# Altium PCB RT_SUPER_C1.PCBdoc (part 3 of 3)
Units mil, origin at the board's own origin, x right, y up, seen from the top; angles counter-clockwise.
Board outline 1450 x 1450 mil, 6 copper layers (Top Layer, GND2, PWR3, PWR4, GND5, Bottom Layer), stack 39.512 mil thick; 158 components, 116 nets, 476 pads, 207 vias.
Unrouted connection lines stored in the file: 5.
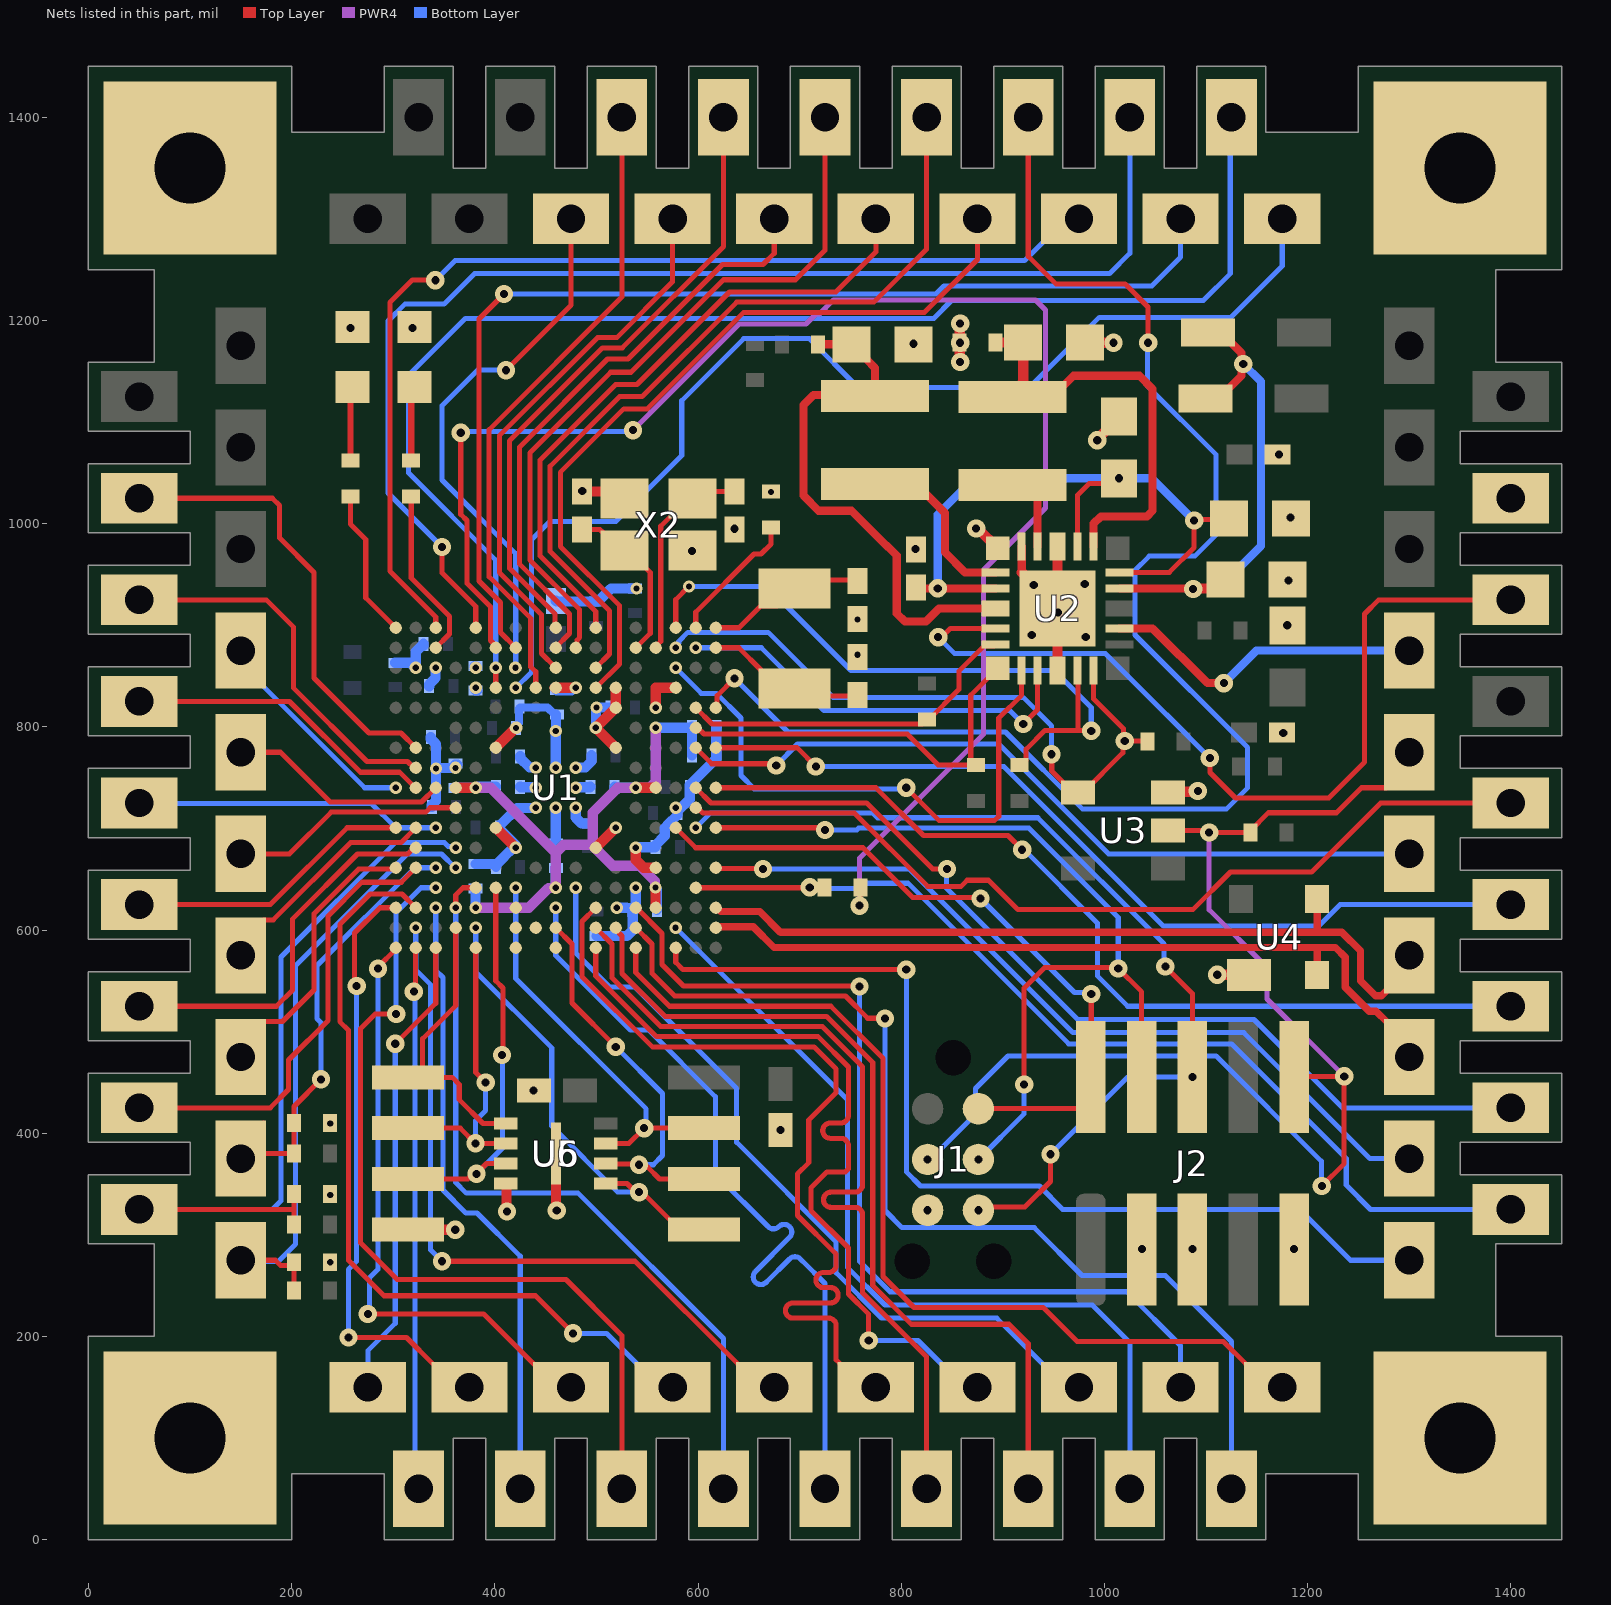
[diagram p6: the nets of this part, all layers, seen from the top]

## Via types
v1: diameter 18, hole 8, Top Layer to Bottom Layer, tented both sides, 116 vias
v2: diameter 12, hole 6, Top Layer to Bottom Layer, tented both sides, 91 vias

## Nets (pads, with @x,y where several pads share a name; then routed paths per layer and width w, separated by ;. In a path a pad name is that pad's centre, name@x,y a point inside that pad or via, vN(x,y) a via of type N, cw(c..) or ccw(c..) an arc to the next point about the centre after c; other vN are vias at no path point) (continued)
FC0-SSEL0: T6.1 U1.H2 | length 375.8
  Top Layer w5: T6.1@50,925 175,925 202,898 202,838 274.13,765.87 314.13,765.87 320.31,759.68 U1.H2@322.2,759.68
FC0-SSEL1: T7.1 U1.J1 | length 216.1
  Bottom Layer w5: T7.1@150,875 172.5,852.5 172.5,839.5 272,740 v2(302.52,740)
FC0-TXD: T4.1 U1.G2 | length 453.5
  Top Layer w5: T4.1@50,1025 181,1025 188,1018 188,986 222,952 222,848.14 276.14,794 307.57,794 U1.G2@322.2,779.37
FC1-CLK: T8.1 U1.J2 | length 307.4
  Top Layer w5: T8.1@50,825 198,825 267.73,755.27 306.34,755.27 321.61,740 U1.J2@322.2,740
FC1-RXD: T10.1 U1.L3 | length 302
  Bottom Layer w5: T10.1@50,725 50.48,724.52 278.48,724.52 302.37,700.63 v2(341.89,700.63)
FC1-SSEL0: T9.1 U1.J3 | length 218
  Top Layer w5: T9.1@150,775 189,775 238,726 327.89,726 U1.J3@341.89,740
FC1-SSEL1: T12.1 U1.L1 | length 283.8
  Top Layer w5: T12.1@50,625 179,625 254.63,700.63 U1.L1@302.52,700.63
FC1-TXD: T11.1 U1.K4 | length 230.3
  Top Layer w5: T11.1@150,675 198,675 239,716 332.03,716 336.35,720.31 U1.K4@361.57,720.31
FC2-CLK: T62.1 U1.A3 | length 1051.7
  Top Layer w5: v1(341.51,1239.48) 341.07,1239.92 318.92,1239.92 296.63,1217.63 296.63,953.37 341.89,908.11 U1.A3@341.89,897.48
  Bottom Layer w5: v1(341.51,1239.48) 361.03,1259 921.5,1259 962.5,1300 T62.1@975,1300
FC2-SDA: T59.1 U1.D6 | length 1347.9
  Top Layer w5: U1.D6@400.94,838.43 v2(400.94,858.11)
  Bottom Layer w5: v2(400.94,858.11) 400.94,964.06 315,1050 315,1146 371,1202 832,1202 849.5,1219.5 1097.36,1219.5 1123.84,1245.98 1123.84,1398.84 T59.1@1125,1400
FC2-SSEL0: T58.1 U1.D7 | length 1120.5
  Bottom Layer w5: v2(420.63,838.43) 436,853.8 436,984 454,1002 519,1002 584,1067 584,1121 645,1182 709.5,1182 757.5,1134 926,1134 995,1203 1124.53,1203 1175,1253.47 T58.1@1175,1300
FC2-SSEL1: T60.1 U1.B7 | length 1092.1
  Top Layer w5: v1(409,1226) 384.47,1201.47 384.47,943.52 405.7,922.29 405.7,892.73 U1.B7@420.63,877.8
  Bottom Layer w5: v1(409,1226) 834,1226 842,1234 1046.72,1234 1075,1262.28 T60.1@1075,1300
FC2-WS: T61.1 U1.A5 | length 1229.5
  Top Layer w5: v1(348,977) 348.2,976.8 348.2,951.5 381.26,918.44 U1.A5@381.26,897.48
  Bottom Layer w5: v1(348,977) 294.87,1030.13 294.87,1199.48 311.4,1216 350,1216 380,1246 1005,1246 1025,1266 T61.1@1025,1400
FC3-CLK: T72.1 U1.C7 | length 552.4
  Top Layer w5: v1(411,1151) 475,1215 T72.1@475,1300
  Bottom Layer w5: v1(411,1151) 383,1151 348,1116 348,1043 420.63,970.37 420.63,858.58 v2(420.16,858.11) ; T72.1@467.05,1292.05 T72.1@475,1300
FC3-SDA: T70.1 U1.C9 | length 546.7
  Top Layer w5: U1.C9@460,858.11 446,872.11 446,910.27 404.47,951.8 404.47,1086.47 501,1183 520,1183 575,1238 T70.1@575,1300
FC3-SSEL0: T68.1 U1.B9 | length 630.9
  Top Layer w5: U1.B9@460,877.8 460,878.39 473.5,891.89 473.5,911.06 424.47,960.09 424.47,1075.47 511,1162 531,1162 624,1255 664,1255 675,1266 T68.1@675,1300 662.95,1300 T68.1@640.45,1277.5
FC3-SSEL1: T69.1 U1.A9 | length 619.9
  Top Layer w5: U1.A9@460,897.48 459.43,898.05 459.43,910.98 414.47,955.95 414.47,1081.47 506,1173 525.4,1173 625,1272.6 T69.1@625,1400
FC3-WS: T71.1 U1.D8 | length 634.6
  Top Layer w5: U1.D8@440.32,838.43 440.32,854.22 435.39,859.14 435.39,906.74 394.47,947.66 394.47,1092.47 525,1223 T71.1@525,1400
FC4-CLK: T64.1 U1.D11 | length 785.7
  Top Layer w5: U1.D11@499.37,838.43 522.87,861.93 522.87,919.13 464.47,977.53 464.47,1050.47 527,1113 550,1113 645,1208 823.02,1208 875,1259.98 T64.1@875,1300
  PWR4 w5: T64.1@872.6,1300 T64.1@875,1300
FC4-SDA: T65.1 U1.C11 | length 817.1
  Top Layer w5: U1.C11@499.37,858.11 512.87,871.61 512.87,914.11 454.47,972.51 454.47,1056.47 523,1125 545,1125 638,1218 773.01,1218 825,1269.99 T65.1@825,1400
FC4-SSEL0: T66.1 U1.A11 | length 635.7
  Top Layer w5: U1.A11@499.37,897.48 499.37,913.47 444.47,968.37 444.47,1062.47 519,1137 540,1137 631,1228 735.56,1228 775,1267.44 T66.1@775,1300
FC4-SSEL1: T63.1 U1.E17 | length 1486.1
  Top Layer w5: U1.E17@617.48,818.74 618.82,820.08 618.82,830.61 v1(635.93,847.71) ; T63.1@925,1400 925,1263.19 952.19,1236 1020.18,1236 1043,1213.18 v1(1043,1178)
  Bottom Layer w5: v1(635.93,847.71) 688.64,795 902.62,795 978.7,718.92 1119.93,718.92 1141.01,740 1141.01,779.57 1030.17,890.41 1030.17,954.06 1044.1,968 1089,968 1110,989 1110,1067.81 1042.27,1135.54 1042.27,1177.27 v1(1043,1178)
FC4-WS: T67.1 U1.B10 | length 717.7
  Top Layer w5: U1.B10@479.69,877.8 481.02,879.13 481.02,885.27 483.5,887.75 483.5,915.2 434.47,964.23 434.47,1069.47 514,1149 534,1149 625,1240 696,1240 725,1269 T67.1@725,1400
FC5-RXD: T42.1 U1.J16 | length 944.3
  Top Layer w5: U1.J16@597.8,740 612.8,725 766,725 831,660 v1(845,660)
  Bottom Layer w5: v1(845,660) 844.67,659.67 844.67,641 973.67,512 1147.33,512 1234.33,425 T42.1@1400,425
FC5-SCK: T47.1 U1.G16 | length 762.8
  Top Layer w5: U1.G16@597.8,779.37 613.54,763.62 675.38,763.62 v1(677,762)
  Bottom Layer w5: v1(677,762) 698,783 896,783 1004,675 T47.1@1300,675
FC5-SSEL0: T44.1 U1.J17 | length 902
  Top Layer w5: U1.J17@617.48,740 775,740 822,693 905,693 v1(919,679)
  Bottom Layer w5: v1(919,679) 921,679 993,607 993,555 1023,525 T44.1@1400,525
FC5-TXD: T46.1 U1.G17 | length 863.9
  Top Layer w5: U1.G17@617.48,779.37 697.63,779.37 v1(716,761)
  Bottom Layer w5: v1(716,761) 901,761 1058,604 1211,604 1232,625 T46.1@1400,625
FLEXSPI0A-D0: U1.T5 U5.5 U6.5 | length 454.4
  Top Layer w5: U5.5@509.21,350.47 530.01,350.47 538.48,342 545.05,342 582.05,305 U6.5@605.67,305
  Bottom Layer w5: v2(381.26,602.2) 381.26,558.74 456,484 456,407 521,342 v1(542,342)
FLEXSPI0A-D1: U1.U5 U5.2 U6.2 | length 303.4
  Top Layer w5: U6.2@314.33,405 366,405 v1(381,390) 410.71,389.92 U5.2@410.79,389.84 ; U1.U5@381.26,582.52 381.26,459.74 v1(391,450)
  Bottom Layer w5: v1(381,390) 381,412.26 391,422.26 v1(391,450)
FLEXSPI0A-D2: U1.P6 U5.3 U6.3 | length 398.6
  Top Layer w5: U6.3@314.33,355 373.48,355 378.48,360 v1(382,360) 382,360.29 391.79,370.08 410.71,370.08 U5.3@410.79,370.16 ; U1.P6@400.94,641.57 400.94,550.06 408,543 408,478 v1(407,477)
  Bottom Layer w5: v1(382,360) 407.5,385.5 407.5,476.5 v1(407,477)
FLEXSPI0A-D3: U1.P7 U5.7 U6.7 | length 393.3
  Top Layer w5: U5.7@509.21,389.84 509.29,389.92 531.92,389.92 v1(547,405) U6.7@605.67,405
  Bottom Layer w5: v2(420.63,641.57) 420.63,552.37 549,424 549,407 v1(547,405)
FLEXSPI0A-D4: U1.T7
FLEXSPI0A-D5: U1.U7 | length 1.9
  Top Layer w5: U1.U7@419.29,581.18 U1.U7@420.63,582.52
FLEXSPI0A-D6: U1.R7
FLEXSPI0A-D7: U1.T8 | length 1.9
  Top Layer w5: U1.T8@440.32,600.31 U1.T8@440.32,602.2
FLEXSPI0A-DQS: U1.U9
FLEXSPI0A-SCK: U1.T9 U5.6 U6.6 | length 397.2
  Top Layer w5: U1.T9@460,602.2 475.87,586.33 475.87,528.13 v1(519,485) ; U5.6@509.21,370.16 509.79,369.58 541.42,369.58 544.49,366.51 550.49,366.51 562,355 U6.6@605.67,355
  Bottom Layer w5: v1(519,485) 565,439 565,378 556,369 v1(542,369)
FLEXSPI0A-SS0-N: U1.T4 U5.1 U6.1 | length 294
  Top Layer w5: U1.T4@361.57,602.2 361.57,525.57 329,493 329,464.31 U6.1@319.69,455 ; U5.1@410.79,409.53 388.47,409.53 365,433 365,448 358,455 340.33,455 U6.1@319.69,455 ; U6.1@319.69,455 U6.1@314.33,455 U6.1@319.69,455
FLEXSPI0B-CLK: T20.1 U1.U3 | length 466.7
  Top Layer w5: T20.1@275,150 T20.1@275,156.52 ; v1(302,488) 341.89,527.89 U1.U3@341.89,582.52
  Bottom Layer w5: T20.1@275,150 275,186 302,213 v1(302,488)
GND: C1.1 C2.2 C3.1 C4.1 C5.2 C6.1 C7.1 C8.2 C9.1 C10.1 C11.1 C12.1 C13.1 C14.1 C15.1 C16.1 C17.1 C18.1 C19.1 C20.1 C21.1 C22.1 C23.1 C24.1 C25.1 C26.1 C27.1 C28.1 C29.1 C30.1 C31.1 C32.1 C33.1 C34.1 C35.1 C36.1 C37.1 C38.1 C39.1 C40.1 C41.1 C42.2 C43.2 C44.2 C45.2 D3.C D4.C J1.5 J2.3 J2.5 J2.9 pad.2 R1.1 R15.1 R17.1 R18.1 T54.1 U1.C2 U1.C3 U1.D5 U1.D12 U1.D15 U1.E12 U1.E14 U1.F7 U1.F11 U1.G6 U1.G12 U1.H8 U1.H9 U1.H10 U1.J8 U1.J10 U1.K8 U1.K9 U1.K10 U1.L6 U1.L12 U1.M7 U1.M11 U1.M13 U1.N14 U1.P13 U2.9 U2.21 U2.23 U2.24 U2.25 U3.3 U4.1 U5.4 U5.9 U6.4 X2.2 X2.4 | length 1698
  Top Layer w8: U2.25@918.61,951.98 U2.23@918.61,977.57
  Top Layer w10: R18.1@237.72,273 v2(238,273) ; R17.1@237.72,340 238,339.72 v2(238,339) ; v1(258,1192.68) 258.67,1193.35 D3.C@259.93,1193.35 ; U6.4@314.33,305 v1(361,305) ; v1(318.95,1192.68) 319.62,1193.35 D4.C@320.87,1193.35 ; U1.G6@400.94,779.37 U1.F7@420.57,799 ; U1.L6@401.49,700.63 U1.L6@400.94,700.63 v2(420.63,680.94) ; U5.4@410.79,350.47 411.39,349.87 411.39,323.61 v1(412,323) ; U1.F7@420.63,799.06 420.94,799.06 v2(421,799) ; v1(438,442) C43.2@438.36,442 ; U5.9@460,380 U5.9@460,380 460.08,324.92 v1(461,324) ; C19.1@486,1031.7 v1(486,1032) 486.3,1031.7 520.43,1031.7 X2.2@527.54,1024.59 ; U1.M11@499.37,680.94 v2(519.06,700.63) ; U1.G12@519.06,779.37 v2(499.37,799.06) U1.E12@519.06,818.74 U1.E12@519.06,818.74 519,838.37 U1.D12@519.06,838.43 ; v2(538.74,680.94) 538.74,669.13 546.61,661.26 U1.N14@558.43,661.26 ; v2(558.43,818.74) 558.43,838.43 U1.D15@578.11,838.43 ; v1(594,973) X2.4@594.46,973.41 X2.4@594.46,973.41 ; C11.1@636,994.3 v1(636,995) ; v2(672,1031) R1.1@672,1031.72 ; v1(681,403) C42.2@681,403.36 ; C45.2@757,869.68 757.16,869.85 v2(757.16,870.93) ; C44.2@757,905.31 v2(757,905.77) ; v1(812,1177) v1(812,1177) C9.1@812.04,1176.53 ; v1(814,975) 814.23,975 C8.2@814.47,974.76 ; v1(873.74,995.26) 875.33,995.26 U2.24@894.92,975.67 ; U2.25@918.61,951.98 U2.25@953.98,916.61 ; U2.9@953.98,855.59 U2.25@953.98,913.06 ; U2.21@953.98,977.64 U2.25@953.98,916.61 ; v1(954.45,912.58) U2.25@953.98,913.06 ; C7.1@981.09,1178.11 981.2,1178 v1(1009,1178) ; v1(993,1082) 993,1083.16 1014.48,1104.64 C5.2@1014.48,1105.62 ; J2.3@1036.67,285.42 1036.67,285.67 v1(1037,286) ; U3.3@1062.72,735.42 1063.43,736.13 1091.26,736.13 v1(1091.96,736.83) ; J2.5@1086.67,285.42 v1(1086.67,286.09) ; v1(1111,556) U4.1@1140.74,556 ; C4.1@1170.18,1068.11 1171.89,1068.11 v1(1172,1068) ; C3.1@1174.93,794.35 1175.1,794.18 1175.82,794.18 v1(1176,794) ; C18.1@1180,899.51 v1(1180,900) ; C1.1@1179.99,945.11 1181,944.1 v1(1181,944) ; C18.1@1180.24,899.76 C18.1@1180.98,900.5 ; v1(1183,1006) 1183,1005.51 C2.2@1183.4,1005.11 ; J2.9@1186.67,285.42 v1(1186.67,286.09) ; U2.25@953.98,913.06 U2.25@953.98,916.61
  Bottom Layer w5: C38.1@329.89,879.76 C38.1@329.89,879.92
  Bottom Layer w8: v2(421,799) 421,800.97 423.69,803.66 423.69,818.2 424.61,819.12 451.91,819.12 459.03,812 C34.1@461,812
  Bottom Layer w10: C6.1@302,863 316.77,863 321.66,858.11 v2(322.2,858.11) 322.2,873.91 328.14,879.84 329.81,879.84 329.89,879.92 C38.1@329.89,881.73 ; C39.1@335.41,840 335.41,841.81 341.51,847.91 341.51,857.73 v2(341.89,858.11) ; C16.1@337,790 337,788.19 342,783.19 v2(342,759) ; C40.1@338,721.16 338,722.97 342,726.97 v2(342,759) ; C30.1@361.08,763 C30.1@363.05,763 ; v2(361.4,759.63) 361.15,759.38 342.38,759.38 v2(342,759) ; C33.1@380.99,835.71 C33.1@382.8,835.71 ; C32.1@382.81,665 C32.1@381,665 C32.1@381,665 399.89,664.92 C24.1@401,663.81 ; C24.1@401,662 C24.1@401,663.81 ; C29.1@425,741 425.5,740.5 439.82,740.5 v2(440.32,740) ; C21.1@425,771 425,769.19 434.12,760.07 439.93,760.07 v2(440.32,759.68) ; v2(440.32,720.31) 439.93,719.93 422.12,719.93 405,702.81 C20.1@405,701 405,699.19 420.25,683.94 420.25,681.33 v2(420.63,680.94) 420.25,680.56 417.61,680.56 408.87,671.82 408.87,671.68 C24.1@401,663.81 ; C27.1@460,685.26 v2(460,720.31) ; v2(460,759.68) v2(460,796) 460.38,796.38 C34.1@460.38,811.92 ; C10.1@460,924.06 460.87,923.18 C36.1@499.57,923.18 ; v2(479.69,720.31) 479.69,710.61 485.54,704.76 C15.1@492.48,704.76 ; v2(479.69,740) 480.19,740.5 493.5,740.5 C28.1@494,741 ; v2(479.69,759.68) 479.93,759.93 489.14,759.93 495,765.78 C22.1@495,772 ; v2@498.95,800.01 499.37,799.6 v2(499.37,799.06) 499.69,799.37 499.69,818.68 v2(500,819) C41.1@514,819 ; C12.1@500,594 529.93,594 535.79,599.86 535.79,617.92 535.6,618.11 C31.1@535.6,619.92 C31.1@535.6,621.73 ; C36.1@501.46,923.26 514.25,936.06 C37.1@538,936.06 ; v2(520.04,621.89) 529.74,621.89 529.82,621.81 535.52,621.81 C31.1@535.6,621.73 ; v2(538.74,641.57) 538.74,624.87 C31.1@535.6,621.73 ; v2(538.74,680.94) 539.23,681.44 557.74,681.44 C14.1@558.24,681.93 558.24,683.74 567.31,692.82 567.31,700.48 570.8,703.97 570.8,704.11 579.88,713.19 C23.1@579.88,715 C23.1@579.88,716.81 ; C37.1@538.94,936.06 539,936 v2(539.5,936) ; v2(578.11,720.31) 578.11,718.58 C23.1@579.88,716.81 ; C25.1@591.88,741 C25.1@591.8,740.16 ; C25.1@591.88,741 591.88,742.81 617.92,768.85 617.92,771.92 C35.1@618,772 C26.1@618,800 C26.1@618.39,800 ; C25.1@591.96,740 C25.1@591.8,740.16 ; C23.1@579.88,716.81 591.8,728.73 C25.1@591.8,740.16
  other v1: 826,324.15 981.66,888.5 928.51,890.31 930.48,939.52 980.68,940.51
  other v2: 238,409.5 381.26,838.43
GREEN-LED: R19.2 U1.A1 | length 147.5
  Top Layer w5: R19.2@258,1026.57 258,999.43 273,984.43 273,927 U1.A1@302.52,897.48
HS-SPI-MISO: T14.1 U1.M2 | length 377.8
  Top Layer w5: T14.1@50,525 185,525 201,541 201,611 264.85,674.85 314.21,674.85 320.31,680.94 U1.M2@322.2,680.94
HS-SPI-MOSI: T15.1 U1.N1 | length 280.9
  Top Layer w5: T15.1@150,475 150,487.5 172.5,510 191,510 222,541 222,616 266.01,660.01 301.27,660.01 U1.N1@302.52,661.26
HS-SPI-SCK: T13.1 U1.L2 | length 231.6
  Top Layer w5: T13.1@150,575 150,587.5 172.5,610 182,610 258.02,686.02 307.59,686.02 U1.L2@322.2,700.63
HS-SPI-SSEL0: T16.1 U1.N2 | length 447.3
  Top Layer w5: T16.1@50,425 179,425 197,443 197,472 236,511 236,613.86 269.14,647 307.94,647 U1.N2@322.2,661.26
I3C0-PUR: R16.1 U1.B6 | length 1539.9
  Top Layer w5: v1(366.5,1089.49) 366.5,1009.24 372.63,1003.11 372.63,941.21 395.7,918.15 395.7,884.94 400.94,879.69 U1.B6@400.94,877.8 ; v1(759,624) 759.36,624.36 759.36,641.64 R16.1@759.72,642
  PWR4 w5: v1(536,1092) 640.5,1196.5 706.17,1196.5 716.07,1206.4 719.61,1206.4 733.21,1220 932.19,1220 942,1210.19 942,1015.43 881,954.43 881,792.67 759,670.67 v1(759,624)
  Bottom Layer w5: v1(366.5,1089.49) 367.75,1090.75 534.75,1090.75 v1(536,1092)
I3C0-SCL: T41.1 U1.N17 | length 801.1
  Top Layer w5: U1.N17@617.48,661.26 618.11,660.63 663.37,660.63 v1(664,660)
  Bottom Layer w5: v1(664,660) 808,660 969,499 1137.25,499 1261.25,375 T41.1@1300,375
I3C0-SDA: R16.2 T40.1 U1.P16 | length 967.3
  Top Layer w5: U1.P16@597.8,641.57 709.57,641.57 v1(710,642) R16.2@724.28,642
  Bottom Layer w5: v1(710,642) 711,641 756.69,641 761.69,646 806.86,646 964.86,488 1125,488 1238,375 1238,349 1262,325 T40.1@1400,325
ISP0: R12.1 R15.2 T17.1 U1.N3 | length 453.3
  Top Layer w5: T17.1@150,375.14 T17.1@150,375 ; T17.1@172.5,410 150,387.5 T17.1@150,375 ; v1(229,453) 202.28,426.28 R15.2@202.28,410 R12.1@202.28,380 155,380 T17.1@150,375
  Bottom Layer w5: v1(229,453) 229,508.76 225,512.76 225,565 321.26,661.26 v2(341.89,661.26)
ISP1: R13.1 R17.2 T18.1 U1.M4 | length 787.4
  Top Layer w5: T18.1@50,325 202,325 202.14,325.14 ; 201.14,325.14 202.14,324.14 ; R13.1@202.28,310 R17.2@202.28,340
  Bottom Layer w5: T18.1@50,325 181,325 189.5,333.5 189.5,573.5 302,686 350.38,686 354.1,682.28 360.24,682.28 v2(361.57,680.94)
ISP2: R14.1 R18.2 T19.1 U1.N4 | length 625.1
  Top Layer w5: T19.1@150,275 184,275 189,270 202.28,270 R14.1@202.28,245
  Bottom Layer w5: T19.1@150,275 153,272 154.57,273.57 186.57,273.57 204,291 204,565 313.76,674.76 347.48,674.76 360.98,661.26 v2(361.57,661.26)
MCLK: T48.1 U1.K16 | length 892.2
  Top Layer w5: U1.K16@597.8,720.31 599.69,720.31 605,715 754,715 826,643 859,643 865,649 886,649 915,620 1087,620 1124,657 1204,657 1272,725 T48.1@1400,725
NetC1_2: C1.2 D1.2 D2.2 U2.16 | length 487.9
  Top Layer w8: U2.16@1015.09,936.21 v1@1086.67,936.21 ; D2.2@1099.63,1123.21 1112.43,1123.21 1134.75,1145.54 1134.75,1155.2 v1(1136.67,1157.11) 1134.75,1159.03 1134.75,1167.8 1114.55,1188 D1.2@1101.76,1188
  Top Layer w10: v1@1086.67,936.21 v1(1087.33,935.55) ; v1@1087.33,936.3 1110.15,936.3 C1.2@1118.96,945.11
  Bottom Layer w8: v1(1087.33,935.55) 1111.55,935.55 1154,978 1154,1139.78 v1(1136.67,1157.11)
NetC2_1: C2.1 C5.1 C8.1 U2.2 U2.17 U2.20 | length 677.6
  Top Layer w5: U2.20@973.66,977.64 973.66,1028.25 984.96,1039.55 1009.43,1039.55 v1(1014.48,1044.6) ; U2.17@1015,952.05 1063.8,952.05 1088.31,976.56 v1(1088.31,1003.14) ; v1@1089.3,1004.12 1121.38,1004.12 C2.1@1122.37,1005.11
  Top Layer w8: C8.1@814.47,937.36 815.53,936.3 v1(836,936.3) U2.2@892.95,936.3
  Bottom Layer w8: v1(836,936.3) 836,1008.98 871.62,1044.6 1046.85,1044.6 v1(1088.31,1003.14)
NetC7_2: C7.2 L2.2 R7.1 U2.19 | length 444.4
  Top Layer w5: C7.2@904.99,1178.11 C7.2@920.07,1178.11
  Top Layer w8: L2.2@910.32,1124.48 L2.2@909.48,1124.48 921.22,1136.23 960.16,1136.23 969.47,1145.54 1034.49,1145.54 1047.45,1132.58 1047.45,1012.71 1041.81,1007.07 996.46,1007.07 989.41,1000.03 U2.19@989.41,977.64
  Top Layer w10: R7.1@892.72,1178.11 C7.2@904.99,1178.11 ; L2.2@904.99,1123.91 L2.2@904.99,1128.48 ; L2.2@909.48,1128.48 920.07,1139.07 C7.2@920.07,1178.11
NetC9_2: C9.2 L3.2 R10.1 U2.3 | length 534.5
  Top Layer w8: R10.1@718.05,1176.53 752,1176.53 765.71,1162.81 765.71,1161.83 774.2,1153.34 774.2,1128.48 772.14,1126.42 713.74,1126.42 703.91,1116.59 703.91,1027.53 718.74,1012.71 750.99,1012.71 785.98,977.72 786.61,977.72 795.63,968.71 795.63,911.69 803.55,903.76 824.39,903.76 837.24,916.61 U2.3@892.95,916.61
NetC11_2: C11.2 U1.B14 X2.1 | length 208.5
  Top Layer w5: U1.B14@558.43,877.8 558.43,879.31 563.34,884.22 563.34,997.41 590.53,1024.59 X2.1@594.46,1024.59 601.57,1031.7 C11.2@636,1031.7
NetC19_2: C19.2 U1.B13 X2.3 | length 164.9
  Top Layer w5: C19.2@486,994.3 503.34,994.3 506.41,991.23 506.41,990.59 523.6,973.41 X2.3@527.54,973.41 531.47,973.41 553,951.88 553,892.06 U1.B13@538.74,877.8
NetC44_1: C44.1 U1.A17 X1.1 | length 161
  Top Layer w5: U1.A17@617.48,897.48 640.31,897.48 661.86,919.03 677.81,919.03 696.5,937.71 703.47,944.68 757,944.68 C44.1@758.97,944.68
NetC45_1: C45.1 U1.B17 X1.2 | length 159.7
  Top Layer w5: U1.B17@617.48,877.8 640.2,877.8 662.07,855.93 662.07,854.97 679.25,837.79 X1.2@695,837.79 702.47,830.31 C45.1@757,830.31
NetD3_A: D3.A R19.1 | length 73.1
  Top Layer w6: R19.1@258,1062 258,1132.36 D3.A@259.93,1134.29
NetD4_A: D4.A R20.1 | length 73.3
  Top Layer w6: R20.1@317.73,1062.32 317.73,1131.16 D4.A@320.87,1134.29
NetL2_1: L2.1 U2.22 | length 82.2
  Top Layer w8: L2.1@909.48,1041.87 922.54,1041.87 934.29,1030.12 U2.22@934.29,977.64
NetL3_1: L3.1 U2.1 | length 178.6
  Top Layer w8: L3.1@774.2,1041.87 811.6,1041.87 843.09,1010.38 843.09,971.78 862.83,952.05 U2.1@892.95,952.05
NetR1_2: R1.2 U1.A16 | length 133.6
  Top Layer w5: U1.A16@597.8,897.48 597.8,912.8 655,970 662,970 672,980 R1.2@672,996.28
PDM-CLK01: T22.1 U1.R1 | length 592.3
  Top Layer w5: v1(256,199) 313,199 339.5,172.5 352.5,172.5 T22.1@375,150 ; v1(264,545) 262,547 262,597 286.89,621.89 U1.R1@302.52,621.89
  Bottom Layer w5: v1(256,199) 256,266 264,274 v1(264,545)
PDM-CLK23: T24.1 U1.U1 | length 601.7
  Top Layer w5: v1(275,222) 389,222 438.5,172.5 452.5,172.5 T24.1@475,150 ; v1(285,562) 285,563.5 302.52,581.02 U1.U1@302.52,582.52
  Bottom Layer w5: v1(275,222) 276.69,223.69 276.69,257.69 285,266 v1(285,562)
PDM-CLK45: T26.1 U1.R2 | length 810.2
  Top Layer w5: U1.R2@322.2,621.89 308.7,635.39 277.52,635.39 247.5,605.37 247.5,509.83 256,501.33 256,275 291,240 440,240 v1(477,203)
  PWR4 w5: T26.1@562.5,150 T26.1@575,150
  Bottom Layer w5: v1(477,203) 510,203 540,173 540,172.5 562.5,150 T26.1@575,150
PDM-CLK67: T28.1 U1.T2 | length 717.3
  Top Layer w5: v1(348,274) 538,274 639.5,172.5 652.5,172.5 T28.1@675,150
  Bottom Layer w5: v2(322.2,602.2) 322.2,560.8 336.83,546.17 336.83,285.17 v1(348,274)
PDM-DATA01: T21.1 U1.U2 | length 535.2
  Top Layer w5: v1(320.33,539.33) 322.1,541.1 322.1,582.42 U1.U2@322.2,582.52
  Bottom Layer w5: v1(320.33,539.33) 321.34,538.33 321.34,53.66 T21.1@325,50
PDM-DATA23: T23.1 U1.R3 | length 612.8
  Bottom Layer w5: v2(341.89,621.89) 341.89,560.39 349,553.28 349,344 371.5,321.5 382.5,321.5 425,279 T23.1@425,50
PDM-DATA45: T25.1 U1.P3 | length 846.5
  Top Layer w5: v1(302.9,517.29) 282.29,517.29 268,503 268,292 304,256 470,256 525,201 T25.1@525,50
  Bottom Layer w5: v1(302.9,517.29) 302.9,617.18 327.29,641.57 v2(341.89,641.57)
PDM-DATA67: T27.1 U1.P5 | length 780.7
  Top Layer w5: v2(361.57,621.89) 361.57,634.57 368.57,641.57 U1.P5@381.26,641.57
  Bottom Layer w5: v2(361.57,621.89) 361.57,351.43 372,341 482,341 625,198 T27.1@625,50
PIO2-4: T37.1 U1.T13 | length 1027.7
  Top Layer w5: U1.T13@538.74,602.2 554.61,586.33 554.61,557.39 577,535 745.17,535 767,513.17 783.83,513.17 v1(784,513)
  Bottom Layer w5: v1(784,513) 784,323.87 800.8,307.07 930.93,307.07 978,260 1060,260 1125,195 T37.1@1125,50
PIO2-5: T38.1 U1.U13 | length 955.4
  Top Layer w5: U1.U13@538.74,582.52 538.74,558.26 572,525 730.67,525 782,473.67 782,259 812.47,228.53 939.7,228.53 973.23,195 1117,195 1139.5,172.5 1152.5,172.5 T38.1@1175,150
PIO2-6: T39.1 U1.U15 | length 974.2
  Top Layer w5: U1.U15@578.11,582.52 578.11,568.17 585.28,561 v1(805,561)
  Bottom Layer w5: v1(805,561) 805,362 819,348 936,348 959,325 1192.22,325 1242.22,275 T39.1@1300,275
PMIC-INTB: R2.1 U1.A15 U2.10 | length 663.8
  Top Layer w5: U1.A15@578.11,897.48 578.11,925.11 v2(591,938) ; R2.1@916.38,762.45 918.35,762.45 922.74,766.84 922.74,769.5 923,769.77 923,778 941.5,796.5 v1@986.5,796.5 ; U2.10@973.66,855.59 974.14,855.11 974.14,797 ; v1@986.85,796.15 v1(987,796)
  Bottom Layer w5: v2(591,938) 668,938 750.52,855.48 950.52,855.48 987,819 v1(987,796)
PMIC-MODE0: U1.C15 U2.7 | length 568.7
  Top Layer w5: v1(805,740) 837,708 892,708 896,712 896,808.64 918.54,831.19 U2.7@918.54,855.59
  Bottom Layer w5: v2(578.11,858.11) 603.22,833 618.01,833 642.37,808.64 642.37,751.99 655.36,739 804,739 v1(805,740)
PMIC-MODE1: U1.B16 U2.8 | length 411.9
  Top Layer w5: v1(920.07,802.87) 934.29,817.1 U2.8@934.29,855.59
  Bottom Layer w5: v2(597.8,877.8) 662.2,877.8 723.94,816.06 906.88,816.06 v1(920.07,802.87)
PMIC-ON: T52.1 U2.4 | length 863.9
  Top Layer w5: v1(836.34,888.26) 839.86,888.26 848.52,896.93 U2.4@892.95,896.93 ; v1(1103.8,769.34) 1103.87,769.27 1103.87,755.13 1129,730 1220.77,730 1256,765.23 1256,911 1270,925 T52.1@1400,925
  Bottom Layer w5: v1(836.34,888.26) 852.6,872 1000.97,872 1060.89,812.08 1061.06,812.08 v1(1103.8,769.34)
PMIC-RESETN: R5.1 U1.B15 U2.11 U3.4 | length 677.9
  Top Layer w5: v1(948,773) 948.14,772.86 948.14,756.5 969.22,735.42 U3.4@974.14,735.42 ; U3.4@977.8,739.08 U3.4@974.14,735.42 ; U2.11@989.41,855.59 989.41,827.49 1018.78,798.12 1018.78,787.22 v1(1020,786) ; R5.1@1042.25,785.41 1041.66,786 v1(1020,786) ; U3.4@974.14,735.42 979.06,735.42 1018.15,774.51 1018.15,784.15 v1(1020,786)
  Bottom Layer w5: v2(578.11,877.8) 578.11,879.69 581,882.58 581,884 590,893 669,893 733,829 920,829 948,801 v1(948,773)
PMIC-SCL: R3.1 U1.E16 U2.5 | length 343.9
  Top Layer w5: U1.E16@597.8,818.74 613.67,802.87 816.03,802.87 ; 816.05,802.89 820.93,802.89 R3.1@825.31,807.28 ; R3.1@826.5,806.5 856.67,836.67 856.67,854.74 881.67,879.74 891.52,879.74 U2.5@892.95,881.18
PMIC-SDA: R4.1 U1.F16 U2.6 | length 399
  Top Layer w5: U1.F16@597.8,799.06 599.69,799.06 605.87,792.87 805.91,792.87 836.34,762.45 R4.1@872.85,762.45 ; R4.1@873.74,762.45 R4.1@872.85,762.45 ; U2.6@894.92,857.56 868.46,831.1 868.46,766.84 R4.1@872.85,762.45
RED-LED: R20.2 U1.B3 | length 170.3
  Top Layer w5: R20.2@317.73,1026.88 317.73,946.41 355.39,908.75 355.39,891.3 U1.B3@341.89,877.8
RST-EXT: J1.3 J2.10 R8.1 T49.1 U3.2 | length 1253.2
  Top Layer w5: U3.2@1062.72,698.02 1101.11,698.02 v1(1103.08,696.05) R8.1@1143.95,696.05 1143.95,698.02 1161.35,715.42 1228.42,715.42 1253,740 1277.5,740 1300,762.5 T49.1@1300,775 ; J2.10@1186.67,455.42 1187.24,456 v1(1236,456) 1236,370 v1(1214,348)
  PWR4 w5: v1(1103.08,696.05) 1103.08,619.92 1160,563 1160,532 v1(1236,456)
  Bottom Layer w5: v1(826,374.15) 828.45,374.15 873,418.7 873,444 905,476 1110,476 1213.51,372.49 1213.51,348.49 v1(1214,348)
SD-CLK: T34.1 U1.P10 | length 794.8
  Top Layer w5: T34.1@975,150 T34.1@975,159.36
  Bottom Layer w5: v2(479.69,641.57) 479.69,577.31 513,544 538,544 638,444 638,391 736,293 736,262.59 780.59,218 894,218 939.5,172.5 952.5,172.5 T34.1@975,150
SD-CMD: T29.1 U1.R9 | length 797.9
  Bottom Layer w5: v2(460,621.89) 460,575 533.5,501.5 551.5,501.5 617,436 617,360 618,359 619.77,357.23 668.91,308.09 ccw(c674.22,313.39) 679.52,308.09 cw(c684.82,302.79) 690.13,308.09 cw(c684.82,302.79) 690.13,297.48 656.55,263.9 ccw(c661.85,258.6) 656.54,253.29 ccw(c661.85,258.6) 667.15,253.29 690.13,276.27 cw(c695.43,270.96) 700.73,276.27 702.5,274.5 725,252 T29.1@725,50
SD-D0: T30.1 U1.R11 | length 848.8
  Top Layer w5: U1.R11@499.37,621.89 485.87,608.39 485.87,554.13 555,485 714.1,485 736,463.1 736,440 709,413 709,371 698,360 698,319 736,281 ; 735,282 736,281 ; T30.1@775,150 762.5,150 740,172.5 740,173 736,177 736,208 736,210.5 ccw(c728.5,210.5) 728.5,218 693.5,218 cw(c693.5,225.5) 693.5,233 730.5,233 ccw(c730.5,240.5) 730.5,248 723.56,248 cw(c723.56,255.5) 723.56,263 728.5,263 ccw(c728.5,270.5) 736,270.5 736,281
SD-D1: T31.1 U1.T11 | length 844.4
  Top Layer w5: U1.T11@499.37,602.2 515.24,586.33 515.24,553.04 563.28,505 722.38,505 762,465.38 762,367 762,349.5 cw(c754.5,349.5) 754.5,342 731.01,342 ccw(c731.01,334.5) 731.01,327 754.5,327 cw(c754.5,319.5) 762,319.5 762,269 762,243 825,180 T31.1@825,50
SD-D2: T32.1 U1.U11 | length 796
  Top Layer w5: U1.U11@499.37,582.52 499.37,554.77 559.14,495 718.24,495 748,465.24 748,440 748,417.5 cw(c740.5,417.5) 740.5,410 730.22,410 ccw(c730.22,402.5) 730.22,395 740.5,395 cw(c740.5,387.5) 748,387.5 748,385 748,364.93 745.07,362 727,362 711,346 711,324 748,287 748,241.86 768,221.86 v1(768,196)
  Bottom Layer w5: v1(768,196) 816.5,196 862.5,150 T32.1@875,150
SD-D3: T33.1 U1.T12 | length 869.8
  Top Layer w5: U1.T12@519.06,602.2 519.06,600.31 525.24,594.13 525.24,557.19 567.43,515 726.52,515 772,469.52 772,250 810,212 906,212 925,193 T33.1@925,50
SD-DETECT-N: T36.1 U1.R13 | length 932.1
  Top Layer w5: U1.R13@538.74,621.89 539.33,621.89 564.61,596.61 564.61,566.09 585.7,545 758.5,545 v1(759,544.5)
  Bottom Layer w5: v1(759,544.5) 759,274 789,244 1022,244 1075,191 T36.1@1075,150
SD-RESET-N: T35.1 U1.T15 | length 856.9
  Bottom Layer w5: v2(577.99,602.2) 747,433.2 747,268 784,231 988,231 1025,194 T35.1@1025,50
SWCLK: J1.4 J2.4 U1.L17 | length 889.5
  Top Layer w5: U1.L17@617.48,700.63 722.87,700.63 v1(725,698.5) ; v1(921,448) 921,542.97 941,562.97 1012.87,562.97 1036.67,539.17 J2.4@1036.67,455.42
  Bottom Layer w5: v1(725,698.5) 756.21,698.5 758.21,700.5 925.5,700.5 1013.62,612.38 v1(1013.62,562.22) ; v1(876,374.15) 921,419.15 v1(921,448)
SWIO: J1.2 J2.2 U1.L15 | length 693.3
  Top Layer w5: U1.L15@578.11,700.63 597.74,681 762.33,681 811.32,632 877,632 v1(878,631) ; J1.2@876,424.15 974.67,424.15 987,436.48 v1(987,537)
  Bottom Layer w5: v1(878,631) 970.5,538.5 985.5,538.5 v1(987,537)
SWO: J1.6 J2.6 U1.L16 | length 943.4
  Top Layer w5: v1(876,324.15) 879.39,327.53 921.91,327.53 946.88,352.5 v1(946.88,379.27) ; v1(1060,564) 1086.67,537.33 v1(1086.67,455.42)
  Bottom Layer w5: v2(597.8,700.63) 612.17,715 772.03,715 776.53,710.5 934.5,710.5 1058.84,586.16 1058.84,565.16 v1(1060,564) ; v1(946.88,379.27) 1023.03,455.42 v1(1086.67,455.42)
TEMP-SENSE: T51.1 U2.14 | length 320.6
  Top Layer w8: U2.14@1015,896.93 1047.45,896.93 1101.36,843.02 v1(1117.52,843.02)
  Bottom Layer w8: v1(1117.52,843.02) 1149.5,875 T51.1@1300,875
USB_D_N: T43.1 U1.T17 U4.2 | length 787.7
  Top Layer w7.15: U1.T17@617.48,602.2 618.41,603.13 654.44,603.13 674.8,582.78 1209.37,582.78 ; U4.2@1209.37,555.63 1209.37,582.78 ; T43.1@1300,475 1278.58,496.42 1278.58,508.92 1267.37,520.13 1260.58,520.13 1237,543.72 1237,573.22 1227.45,582.78 1209.37,582.78
USB_D_P: T45.1 U1.R17 U4.3 | length 792
  Top Layer w5: T45.1@1299,574 T45.1@1300,575
  Top Layer w7.15: U1.R17@617.48,621.89 618.79,621.89 622.4,618.28 660.72,618.28 681.07,597.93 1209.37,597.93 ; U4.3@1209.37,630.44 1209.37,597.93 ; T45.1@1299,574 1299,561.5 1272.78,535.28 1266.86,535.28 1252.15,549.99 1252.15,579.5 1233.72,597.93 1209.37,597.93
VDD-CORE: C26.2 C27.2 C28.2 C29.2 C30.2 C31.2 C32.2 C33.2 C34.2 C35.2 R7.2 U1.C5 U1.D9 U1.F14 U1.J4 U1.J14 U1.P9 U1.R5 U1.R14 | length 836.7
  Top Layer w10: U1.J4@361.57,740 v2(381.26,740) ; U1.D9@458.93,838.43 U1.D9@460,838.43 v2(479.69,838.43) ; v2(538.74,740) 556.35,740 556.67,740.32 U1.J14@556.67,740.68 ; v2(558,642) 558.21,641.79 558.21,622.1 U1.R14@558.43,621.89 ; v1(858,1159) 857.64,1159.36 857.64,1175.79 857.28,1176.14 857.28,1180.08 857.64,1180.44 857.64,1196.64 v1(858,1197)
  PWR4 w10: v2(381.26,621.89) 433.43,621.89 452.73,641.19 459.62,641.19 v2(460,641.57) 460,676.02 ; v2(381.26,740) 396.02,740 460,676.02 ; v2(558,642) 557.62,642.38 557.62,648.07 542.46,663.23 516.1,663.23 495.43,683.9 ; v2(558.43,799.06) 558.43,745.86 552.57,740 v2(538.74,740) 521.02,740 496.42,715.39 496.42,684.88 495.43,683.9 ; 460,676.02 467.87,683.9 495.43,683.9
  Bottom Layer w10: C30.2@361.08,740 361.16,740.08 369.13,740.08 369.44,740.38 380.88,740.38 v2(381.26,740) 382.34,740 383.34,741 C29.2@401,741 ; C33.2@380.28,859.64 381.26,858.65 v2(381.26,858.11) ; C33.2@380.71,859.79 380.79,859.71 C33.2@380.99,859.71 ; C32.2@380.99,641 380.91,640.92 381.13,640.92 381.13,622.02 v2(381.26,621.89) v2@381.26,622.43 ; v2(460,641.57) C27.2@460,661.26 ; C34.2@461,836 C34.2@461,836 475.29,835.92 477.41,838.04 479.3,838.04 v2(479.69,838.43) ; C28.2@518,741 518,740.08 518.08,740 v2(538.74,740) ; v2(558,642) 558,641.46 559.6,639.86 C31.2@559.6,619.92 ; v2(558.43,799.06) 593.06,799.06 C26.2@594,800 C35.2@594,772
  other v1: 858,1178
pads on no net: J1.A J1.B J1.C J2.7 J2.8 U1.A7 U1.B2 U1.C1 U1.E2 U1.F4 U1.G3 U1.G15 U1.J15 U1.M14 U1.N15 U1.T1 U1.T3 U1.T16 U1.U16 U1.U17 U3.1

## Polygon pours and split planes (outlines as drawn)
+1v8 on PWR4 "+1V8_L04_P003" (solid, remove dead copper, pour order 3): -149.25,-63 1504,-63 1504,1494 -149.25,1494
VDD-CORE on PWR4 "VDD-CORE_L04_P002" (solid, remove dead copper, pour order 2): 358.62,599.25 358.62,728.19 252.32,728.19 252.32,1208 907.83,1208 907.83,1080 574.17,1080 574.17,937.83 574.17,600.24
+VDDIO on PWR3 "+VDDIO_L03_P000" (solid, remove dead copper, pour order 0): -393.35,1621.89 -393.35,-191.1 1565,-191.1 1565,1621.89
GND on GND2 "GND_L02_P005" (solid, remove dead copper, pour order 5): -158.17,1703.99 -158.17,-109 1800.17,-109 1800.17,1703.99
GND on GND5 "GND_L05_P006" (solid, remove dead copper, pour order 6): -231.17,1602 -231.17,-210.99 1727.17,-210.99 1727.17,1602

## Keep-outs
Keep-Out Layer:
  the board outline again, w1

## Silkscreen, mask and mechanical layers (free items; w line width, h text height)
Top Overlay:
  text "75" at 300,1326.56 h40
  text "73" at 400,1325.93 h40
  text "71" at 500,1326.15 h40
  text "69" at 600,1325.92 h40
  text "67" at 700,1325.93 h40
  text "65" at 800,1325.93 h40
  text "63" at 900,1325.93 h40
  text "61" at 1000,1325.93 h40
  text "59" at 1100,1325.92 h40
  text "74" at 337.5,1231.96 h50
  text "72" at 437.5,1231.96 h50
  text "70" at 537.5,1231.68 h50
  text "68" at 637.5,1231.67 h50
  text "66" at 737.5,1231.68 h50
  text "64" at 837.5,1231.68 h50
  text "62" at 937.5,1231.68 h50
  text "60" at 1037.5,1231.68 h50
  text "58" at 1137.5,1231.67 h50
  text "76" at 237,1231.45 h50
  text "1" at 176.96,1212.5 h50 r270
  text "57" at 1231.95,1212.5 h50 r270
  text "2" at 87.95,1149.9 h40 r270
  text "56" at 1325.79,1149.55 h40 r270
  text "55" at 1231.95,1112.5 h50 r270
  text "3" at 174.57,1111.5 h50 r270
  text "4" at 87.95,1050.08 h40 r270
  text "54" at 1325.79,1049.31 h40 r270
  text "53" at 1231.68,1012.5 h50 r270
  text "5" at 174.7,1011.5 h50 r270
  text "52" at 1325.79,951.81 h40 r270
  text "6" at 87.73,949.95 h40 r270
  text "7" at 175.98,912.5 h50 r270
  text "51" at 1231.68,912.5 h50 r270
  text "8" at 87.92,850 h40 r270
  text "50" at 1325.79,849.79 h40 r270
  text "49" at 1231.67,812.5 h50 r270
  text "9" at 175.5,811.5 h50 r270
  text "48" at 1325.79,751.25 h40 r270
  text "10" at 87.93,750 h40 r270
  text "11" at 174.96,712.5 h50 r270
  text "47" at 1231.96,712.5 h50 r270
  text "12" at 88.15,650 h40 r270
  text "46" at 1325.79,649.08 h40 r270
  text "13" at 175.68,612.5 h50 r270
  text "45" at 1231.68,612.5 h50 r270
  text "14" at 88.15,550 h40 r270
  text "44" at 1325.79,548.85 h40 r270
  text "43" at 1231.68,512.5 h50 r270
  text "15" at 175.68,510.5 h50 r270
  text "16" at 87.93,450 h40 r270
  text "42" at 1325.79,449.34 h40 r270
  text "41" at 1232.96,412.5 h50 r270
  text "0" at 249.5,396.54 h32
  text "0" at 174.5,378.54 h32
  text "1" at 249.5,362.72 h32
  text "18" at 87.92,350 h40 r270
  text "40" at 1325.79,349.32 h40 r270
  text "0" at 249.5,325.54 h32
  text "39" at 1231.8,312.55 h50 r270
  text "1" at 171.5,310.54 h32
  text "1" at 249.5,292.72 h32
  text "0" at 249.5,259.54 h32
  text "2" at 173.12,246.54 h32
  text "1" at 249.5,227.72 h32
  text "38" at 1137.5,176.82 h50
  text "20" at 237.5,176 h50
  text "22" at 337.5,176 h50
  text "24" at 437.5,176 h50
  text "26" at 537.5,176 h50
  text "28" at 637.5,176 h50
  text "30" at 737.5,176 h50
  text "32" at 837.5,176 h50
  text "34" at 937.5,176 h50
  text "36" at 1037.5,176 h50
  text "21" at 300,88 h40
  text "23" at 400,87.93 h40
  text "25" at 500,87.93 h40
  text "27" at 600,88.15 h40
  text "29" at 700,87.92 h40
  text "31" at 800,87.93 h40
  text "33" at 899,87.93 h40
  text "35" at 1000,87.93 h40
  text "37" at 1100,87.93 h40
Bottom Overlay:
  text "75" at 350,1326.56 h40
  text "73" at 450,1325.93 h40
  text "71" at 550,1326.15 h40
  text "69" at 650,1325.92 h40
  text "67" at 750,1325.93 h40
  text "65" at 850,1325.93 h40
  text "63" at 950,1325.93 h40
  text "61" at 1050,1325.93 h40
  text "59" at 1150,1325.92 h40
  text "74" at 412.5,1231.96 h50
  text "72" at 512.5,1231.96 h50
  text "70" at 612.5,1231.68 h50
  text "68" at 712.5,1231.67 h50
  text "66" at 812.5,1231.68 h50
  text "64" at 912.5,1231.68 h50
  text "62" at 1012.5,1231.68 h50
  text "60" at 1112.5,1231.68 h50
  text "58" at 1212.5,1231.67 h50
  text "76" at 312,1231.45 h50
  text "1" at 219.04,1212.5 h50 r90
  text "57" at 1274.05,1212.5 h50 r90
  text "2" at 124.05,1149.9 h40 r90
  text "56" at 1362.21,1149.55 h40 r90
  text "Super Monkey" at 686,1115 h125
  text "55" at 1274.05,1112.5 h50 r90
  text "3" at 221.43,1111.5 h50 r90
  text "4" at 124.05,1050.08 h40 r90
  text "54" at 1362.21,1049.32 h40 r90
  text "RT685 Audio Platorm" at 703.83,1030.5 h75
  text "53" at 1274.32,1012.5 h50 r90
  text "5" at 221.3,1011.5 h50 r90
  text "2026.03.16" at 553.5,956 h100
  text "REV C1" at 703,956 h100
  text "52" at 1362.21,951.81 h40 r90
  text "6" at 124.27,949.95 h40 r90
  text "7" at 220.02,912.5 h50 r90
  text "51" at 1274.32,912.5 h50 r90
  text "M" at 1230,873 h700
  text "8" at 124.08,850 h40 r90
  text "50" at 1362.21,849.79 h40 r90
  text "49" at 1274.33,812.5 h50 r90
  text "9" at 220.5,811.5 h50 r90
  text "48" at 1362.21,751.25 h40 r90
  text "10" at 124.07,750 h40 r90
  text "11" at 221.04,712.5 h50 r90
  text "47" at 1274.04,712.5 h50 r90
  text "12" at 123.85,650 h40 r90
  text "46" at 1362.21,649.08 h40 r90
  text "13" at 220.32,612.5 h50 r90
  text "45" at 1274.32,612.5 h50 r90
  text "14" at 123.85,550 h40 r90
  text "44" at 1362.21,548.85 h40 r90
  text "43" at 1274.32,512.5 h50 r90
  text "15" at 220.32,510.5 h50 r90
  text "16" at 124.07,450 h40 r90
  text "42" at 1362.21,449.34 h40 r90
  text "17" at 218.32,412.5 h50 r90
  text "41" at 1273.04,412.5 h50 r90
  text "18" at 124.08,350 h40 r90
  text "40" at 1362.21,349.32 h40 r90
  text "19" at 219.33,312.5 h50 r90
  text "39" at 1274.2,312.55 h50 r90
  text "W" at 509,234 h100
  text "38" at 1212.5,176.82 h50
  text "20" at 312.5,176 h50
  text "22" at 412.5,176 h50
  text "24" at 512.5,176 h50
  text "26" at 612.5,176 h50
  text "28" at 712.5,176 h50
  text "30" at 812.5,176 h50
  text "32" at 912.5,176 h50
  text "34" at 1012.5,176 h50
  text "36" at 1112.5,176 h50
  text "21" at 350,88 h40
  text "23" at 450,87.93 h40
  text "25" at 550,87.93 h40
  text "27" at 650,88.15 h40
  text "29" at 750,87.92 h40
  text "31" at 850,87.93 h40
  text "33" at 949,87.93 h40
  text "35" at 1050,87.93 h40
  text "37" at 1150,87.93 h40
[8] Board Outline:
  drawing of 229 lines, arcs and shapes, not listed